# Altium PCB Side_PCB.PcbDoc (part 2 of 3)
Units mm, origin at the board's own origin, x right, y up, seen from the top; angles counter-clockwise.
Board outline 49.91 x 43.31 mm, 2 copper layers (Top Layer, Bottom Layer), stack 1.448 mm thick; 43 components, 50 nets, 194 pads, 110 vias.
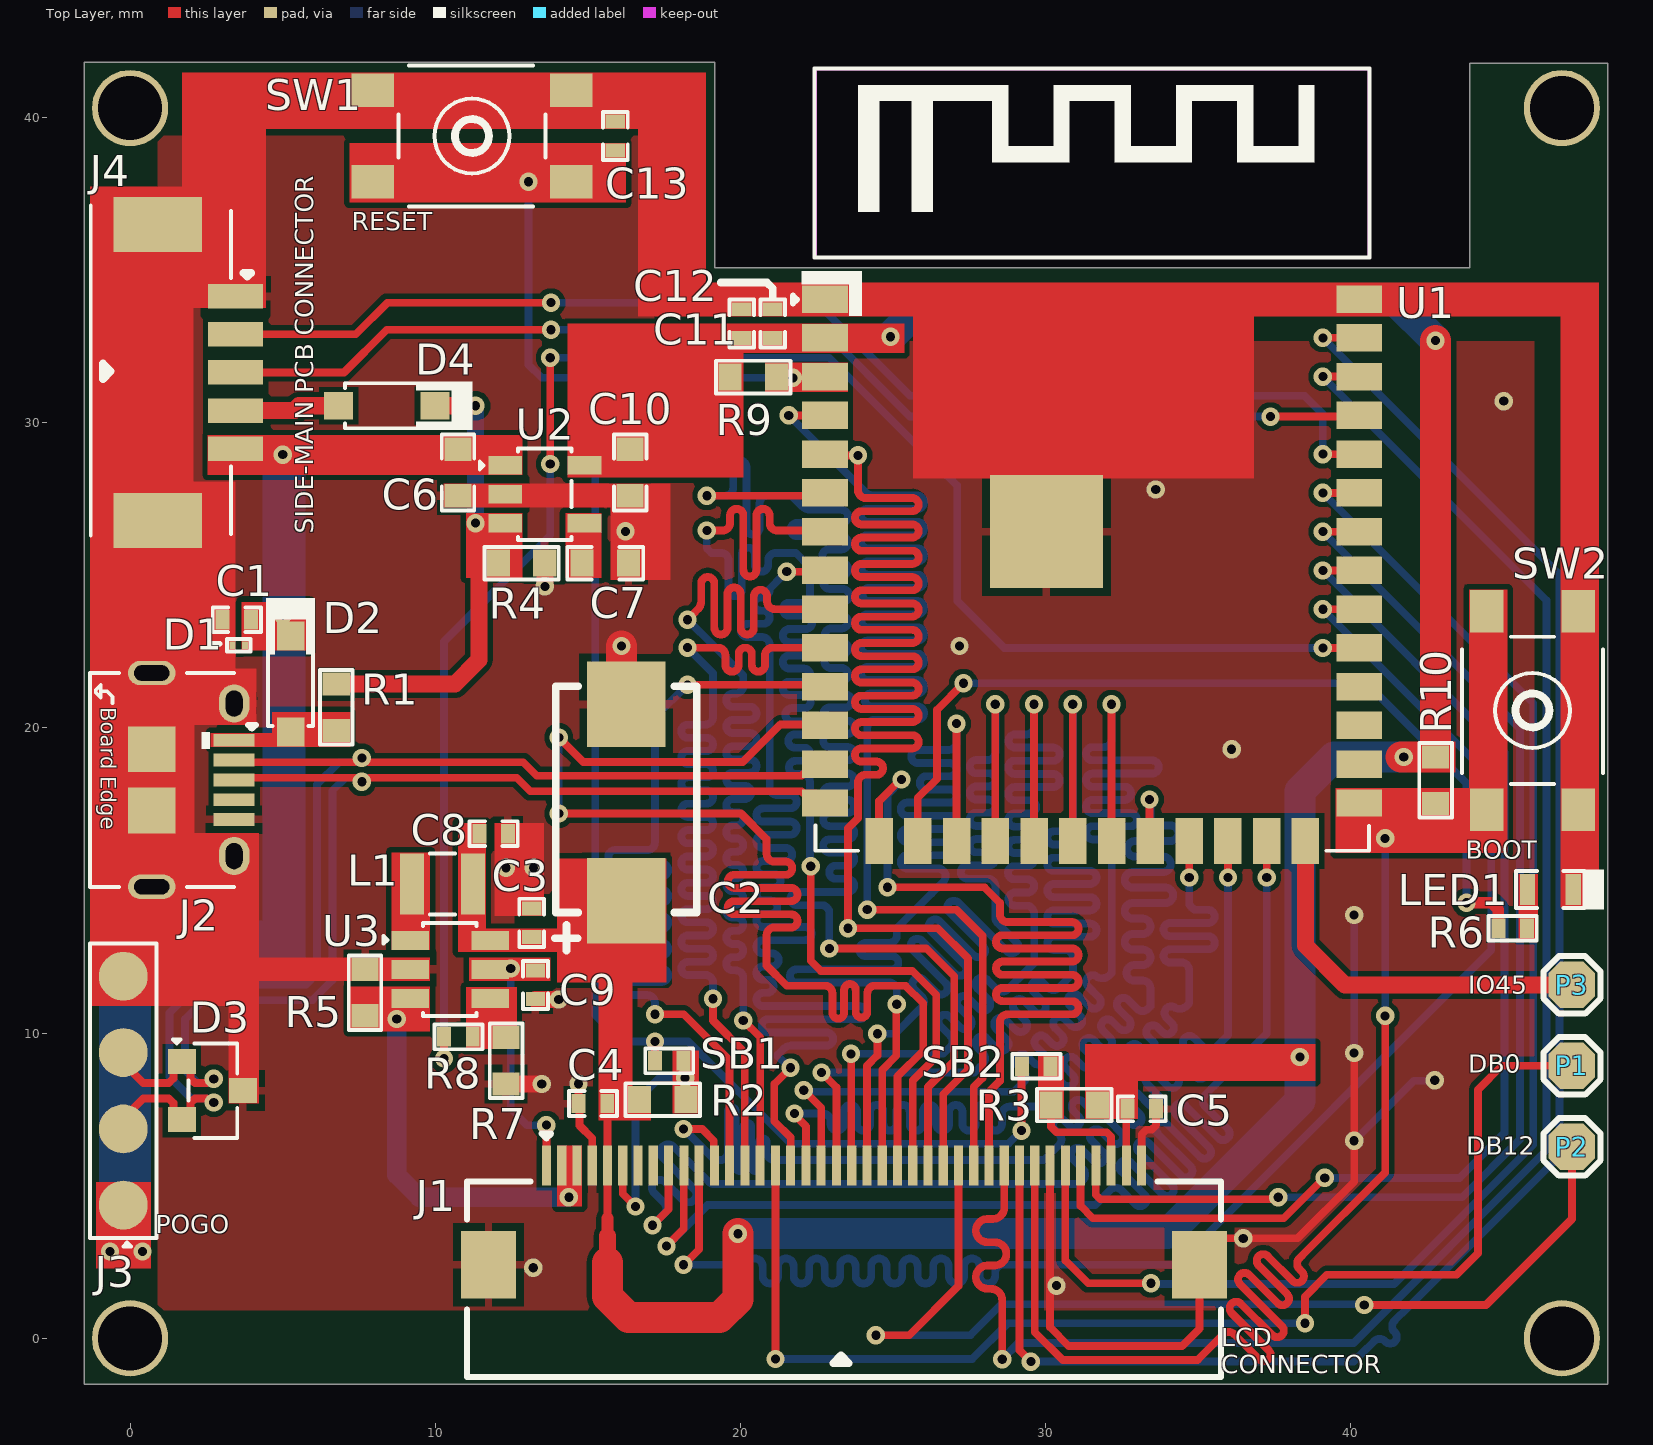
[diagram p0: Top Layer view]

## Via types
v1: diameter 0.6, hole 0.3, Top Layer to Bottom Layer, tented both sides, 102 vias
v2: diameter 0.6, hole 0.3, Top Layer to Bottom Layer, 8 vias

## Nets (pads, with @x,y where several pads share a name; then routed paths per layer and width w, separated by ;. In a path a pad name is that pad's centre, name@x,y a point inside that pad or via, vN(x,y) a via of type N, cw(c..) or ccw(c..) an arc to the next point about the centre after c; other vN are vias at no path point) (continued)
LCD_DB2: (continued)
  Bottom Layer w0.254: v1(21.768,7.366) 22.14,7.366 22.699,7.366 cw(c22.699,7.112) 22.953,7.112 22.953,7.023 ccw(c23.169,7.023) 23.385,7.023 23.385,7.429 cw(c23.601,7.429) 23.817,7.429 23.817,7.023 ccw(c24.032,7.023) 24.248,7.023 24.248,7.429 cw(c24.464,7.429) 24.68,7.429 24.68,7.023 ccw(c24.896,7.023) 25.112,7.023 25.112,7.429 cw(c25.328,7.429) 25.544,7.429 25.544,7.023 ccw(c25.76,7.023) 25.976,7.023 25.976,7.429 cw(c26.191,7.429) 26.407,7.429 26.407,7.023 ccw(c26.623,7.023) 26.839,7.023 26.839,7.429 cw(c27.055,7.429) 27.271,7.429 27.271,7.023 ccw(c27.487,7.023) 27.703,7.023 27.703,7.429 cw(c27.919,7.429) 28.135,7.429 28.135,7.023 ccw(c28.35,7.023) 28.566,7.023 28.566,7.341 cw(c28.82,7.341) 28.82,7.595 29.515,7.595 29.802,7.595 30.15,7.595 30.245,7.69 ccw(c30.066,7.87) 30.245,8.049 30.045,8.25 cw(c30.198,8.403) 30.045,8.555 cw(c30.198,8.403) 30.35,8.555 30.583,8.323 ccw(c30.736,8.475) 30.888,8.323 ccw(c30.736,8.475) 30.888,8.628 30.655,8.861 cw(c30.808,9.013) 30.655,9.166 cw(c30.808,9.013) 30.961,9.166 31.194,8.933 ccw(c31.346,9.086) 31.499,8.933 ccw(c31.346,9.086) 31.499,9.239 31.266,9.472 cw(c31.419,9.624) 31.266,9.777 cw(c31.419,9.624) 31.571,9.777 31.804,9.544 ccw(c31.957,9.697) 32.11,9.544 ccw(c31.957,9.697) 32.11,9.849 31.876,10.082 cw(c32.029,10.235) 31.876,10.388 cw(c32.029,10.235) 32.182,10.388 32.415,10.155 ccw(c32.568,10.307) 32.72,10.155 ccw(c32.568,10.307) 32.72,10.46 32.392,10.789 cw(c32.544,10.941) 32.392,11.094 cw(c32.544,10.941) 32.697,11.094 32.993,10.797 ccw(c33.173,10.977) 33.353,10.797 33.431,10.876 33.431,11.298 33.431,11.342 33.431,11.469 ccw(c33.177,11.469) 33.177,11.723 32.9,11.723 cw(c32.9,11.977) 32.9,12.231 33.177,12.231 ccw(c33.177,12.485) 33.177,12.739 32.847,12.739 cw(c32.847,12.993) 32.847,13.247 33.177,13.247 ccw(c33.177,13.501) 33.177,13.755 32.847,13.755 cw(c32.847,14.009) 32.847,14.263 33.922,14.263 ccw(c33.922,14.517) 33.922,14.771 32.847,14.771 cw(c32.847,15.025) 32.847,15.279 33.843,15.279 ccw(c33.843,15.533) 33.843,15.787 32.922,15.787 cw(c32.922,16.041) 32.922,16.295 34.087,16.295 ccw(c34.087,16.549) 34.087,16.803 33.685,16.803 cw(c33.685,17.057) 33.431,17.057 33.431,17.603 v1@33.431,17.623
LCD_DB3: J1.19 U1.21 | length 44.9
  Top Layer w0.254: v1(22.073,8.128) 22.643,7.557 J1.19@22.643,5.664 ; U1.21@32.156,16.296 v1(32.156,20.777)
  Bottom Layer w0.254: v1(22.073,8.128) 22.123,8.077 28.956,8.077 29.185,8.306 29.274,8.396 ccw(c29.095,8.575) 29.274,8.755 29.087,8.943 cw(c29.239,9.095) 29.087,9.248 cw(c29.239,9.095) 29.392,9.248 29.607,9.033 ccw(c29.759,9.186) 29.912,9.033 ccw(c29.759,9.186) 29.912,9.339 29.697,9.553 cw(c29.85,9.706) 29.697,9.859 cw(c29.85,9.706) 30.002,9.859 30.217,9.644 ccw(c30.37,9.797) 30.523,9.644 ccw(c30.37,9.797) 30.523,9.949 30.308,10.164 cw(c30.46,10.317) 30.308,10.469 cw(c30.46,10.317) 30.613,10.469 30.828,10.255 ccw(c30.981,10.407) 31.133,10.255 ccw(c30.981,10.407) 31.133,10.56 30.779,10.914 cw(c30.931,11.067) 30.779,11.22 cw(c30.931,11.067) 31.084,11.22 31.439,10.865 ccw(c31.591,11.018) 31.744,10.865 ccw(c31.591,11.018) 31.744,11.171 31.387,11.528 cw(c31.539,11.68) 31.387,11.833 cw(c31.539,11.68) 31.692,11.833 ccw(c31.847,12.167) 32.161,11.974 32.161,12.949 32.161,15.966 32.161,16.093 ccw(c31.907,16.093) 31.907,16.347 31.543,16.347 cw(c31.543,16.563) 31.543,16.779 32.772,16.779 ccw(c32.772,16.995) 32.772,17.211 31.539,17.211 cw(c31.539,17.427) 31.539,17.642 32.58,17.642 ccw(c32.58,17.858) 32.58,18.074 31.539,18.074 cw(c31.539,18.29) 31.539,18.506 33.489,18.506 ccw(c33.489,18.722) 33.489,18.938 31.539,18.938 cw(c31.539,19.154) 31.539,19.37 31.907,19.37 ccw(c31.907,19.624) 32.161,19.624 32.161,20.234 v1@32.161,20.777
LCD_DB4: J1.20 U1.20 | length 42.9
  Top Layer w0.254: v1(22.657,8.712) 23.143,8.226 J1.20@23.143,5.664 ; U1.20@30.886,16.296 v1(30.886,20.777)
  Bottom Layer w0.254: v1(22.657,8.712) 27.661,8.712 27.851,8.903 27.941,8.993 ccw(c27.761,9.172) 27.941,9.352 27.766,9.527 cw(c27.918,9.68) 27.766,9.832 cw(c27.918,9.68) 28.071,9.832 28.413,9.49 ccw(c28.566,9.643) 28.718,9.49 ccw(c28.566,9.643) 28.718,9.796 28.376,10.138 cw(c28.529,10.29) 28.376,10.443 cw(c28.529,10.29) 28.682,10.443 29.024,10.101 ccw(c29.176,10.254) 29.329,10.101 ccw(c29.176,10.254) 29.329,10.406 28.987,10.748 cw(c29.14,10.901) 28.987,11.054 cw(c29.14,10.901) 29.292,11.054 29.634,10.712 ccw(c29.787,10.864) 29.94,10.712 ccw(c29.787,10.864) 29.94,11.017 29.598,11.359 cw(c29.75,11.512) 29.598,11.664 cw(c29.75,11.512) 29.903,11.664 30.078,11.489 ccw(c30.258,11.669) 30.437,11.489 30.891,11.943 30.891,12.346 30.891,12.473 ccw(c30.637,12.473) 30.637,12.727 30.269,12.727 cw(c30.269,12.943) 30.269,13.159 31.447,13.159 ccw(c31.447,13.375) 31.447,13.591 30.269,13.591 cw(c30.269,13.807) 30.269,14.023 31.447,14.023 ccw(c31.447,14.239) 31.447,14.455 30.269,14.455 cw(c30.269,14.67) 30.269,14.886 31.447,14.886 ccw(c31.447,15.102) 31.447,15.318 30.269,15.318 cw(c30.269,15.534) 30.269,15.75 30.804,15.75 ccw(c30.804,15.966) 30.804,16.182 30.269,16.182 cw(c30.269,16.398) 30.269,16.614 30.637,16.614 ccw(c30.637,16.868) 30.891,16.868 30.891,17.868 v1@30.891,20.777
LCD_DB5: J1.21 U1.19 | length 41
  Top Layer w0.254: v1(23.622,9.322) 23.633,9.311 23.633,5.674 J1.21@23.643,5.664 ; U1.19@29.616,16.296 v1(29.616,20.777)
  Bottom Layer w0.254: v1(23.622,9.322) 25.342,9.322 26.645,9.322 26.873,9.551 ccw(c26.694,9.73) 26.873,9.91 26.547,10.237 cw(c26.699,10.389) 26.547,10.542 cw(c26.699,10.389) 26.852,10.542 27.206,10.188 ccw(c27.358,10.341) 27.511,10.188 ccw(c27.358,10.341) 27.511,10.494 27.157,10.847 cw(c27.31,11) 27.157,11.153 cw(c27.31,11) 27.463,11.153 27.816,10.799 ccw(c27.969,10.952) 28.122,10.799 ccw(c27.969,10.952) 28.122,11.104 27.768,11.458 cw(c27.921,11.611) 27.768,11.763 cw(c27.921,11.611) 28.073,11.763 28.4,11.436 ccw(c28.58,11.616) 28.759,11.436 29.377,12.054 29.621,12.299 29.621,13.795 29.621,13.922 ccw(c29.367,13.922) 29.367,14.176 28.999,14.176 cw(c28.999,14.392) 28.999,14.608 29.405,14.608 ccw(c29.405,14.824) 29.405,15.04 28.98,15.04 cw(c28.98,15.256) 28.98,15.471 29.405,15.471 ccw(c29.405,15.687) 29.405,15.903 28.986,15.903 cw(c28.986,16.119) 28.986,16.335 29.405,16.335 ccw(c29.405,16.551) 29.405,16.767 28.986,16.767 cw(c28.986,16.983) 28.986,17.199 29.47,17.199 ccw(c29.47,17.415) 29.47,17.63 28.986,17.63 cw(c28.986,17.846) 28.986,18.062 30.244,18.062 ccw(c30.244,18.278) 30.244,18.494 28.986,18.494 cw(c28.986,18.71) 28.986,18.926 30.244,18.926 ccw(c30.244,19.142) 30.244,19.358 28.999,19.358 cw(c28.999,19.574) 28.999,19.789 29.367,19.789 ccw(c29.367,20.043) 29.621,20.043 29.621,20.562 v1@29.621,20.777
LCD_DB6: J1.22 U1.18 | length 42.7
  Top Layer w0.254: J1.22@24.143,5.664 24.143,8.929 24.486,9.271 v1(24.486,9.982) ; U1.18@28.346,16.296 v1(28.346,20.777)
  Bottom Layer w0.254: v1(24.486,9.982) 25.07,9.982 25.845,10.757 25.934,10.847 ccw(c25.755,11.026) 25.934,11.206 25.692,11.448 cw(c25.844,11.601) 25.692,11.754 cw(c25.844,11.601) 25.997,11.754 26.42,11.331 ccw(c26.572,11.484) 26.725,11.331 ccw(c26.572,11.484) 26.725,11.636 25.64,12.722 cw(c25.792,12.874) 25.64,13.027 cw(c25.792,12.874) 25.945,13.027 27.03,11.942 ccw(c27.183,12.094) 27.336,11.942 ccw(c27.183,12.094) 27.336,12.247 26.226,13.356 cw(c26.379,13.509) 26.226,13.662 cw(c26.379,13.509) 26.532,13.662 27.643,12.551 ccw(c27.796,12.703) 27.948,12.551 ccw(c27.796,12.703) 27.948,12.856 26.837,13.967 cw(c26.99,14.12) 26.837,14.272 cw(c26.99,14.12) 27.142,14.272 28.732,12.683 ccw(c28.884,12.836) 29.037,12.683 ccw(c28.884,12.836) 29.037,12.989 28.426,13.6 cw(c28.605,13.779) 28.351,13.779 28.351,14.6 28.351,14.681 28.351,14.808 ccw(c28.097,14.808) 28.097,15.062 27.432,15.062 cw(c27.432,15.278) 27.432,15.494 28.135,15.494 ccw(c28.135,15.71) 28.135,15.926 27.727,15.926 cw(c27.727,16.142) 27.727,16.358 28.135,16.358 ccw(c28.135,16.574) 28.135,16.789 27.727,16.789 cw(c27.727,17.005) 27.727,17.221 28.135,17.221 ccw(c28.135,17.437) 28.135,17.653 27.727,17.653 cw(c27.727,17.869) 27.727,18.085 28.135,18.085 ccw(c28.135,18.301) 28.135,18.517 27.727,18.517 cw(c27.727,18.733) 27.727,18.948 28.097,18.948 ccw(c28.097,19.202) 28.351,19.202 28.351,20.218 v1@28.351,20.777
LCD_DB7: J1.23 U1.17 | length 42.1
  Top Layer w0.254: J1.23@24.643,5.664 24.643,8.794 25.107,9.257 25.107,10.934 v1(25.121,10.947) ; U1.17@27.081,16.291 v1@27.081,20.137
  Bottom Layer w0.254: v1(25.121,10.947) 25.121,11.278 25.121,11.405 ccw(c24.867,11.405) 24.867,11.659 21.836,11.659 cw(c21.836,11.875) 21.836,12.09 24.957,12.09 ccw(c24.957,12.306) 24.957,12.522 24.109,12.522 cw(c24.109,12.738) 24.109,12.954 24.867,12.954 ccw(c24.867,13.208) 25.121,13.208 25.121,13.437 26.264,14.58 26.444,14.76 26.645,14.961 ccw(c26.465,15.141) 26.465,15.395 25.463,15.395 cw(c25.463,15.611) 25.463,15.826 26.863,15.826 ccw(c26.863,16.042) 26.863,16.258 25.463,16.258 cw(c25.463,16.474) 25.463,16.69 26.863,16.69 ccw(c26.863,16.906) 26.863,17.122 25.463,17.122 cw(c25.463,17.338) 25.463,17.554 26.863,17.554 ccw(c26.863,17.77) 26.863,17.985 26.094,17.985 cw(c26.094,18.201) 26.094,18.417 26.863,18.417 ccw(c26.863,18.633) 26.863,18.849 25.809,18.849 cw(c25.809,19.065) 25.809,19.281 26.825,19.281 ccw(c26.825,19.535) 27.079,19.535 27.079,20.14 v1@27.079,20.142
  other v1: 27.076,20.142